# Altium PCB PROC106B_ASCII.PcbDoc (part 3 of 8)
Units mil, origin at the board's own origin, x right, y up, seen from the top; angles counter-clockwise.
Board outline 4498.18 x 1060.53 mil, 8 copper layers (Top Layer, GND1, Sig1, PWR1, PWR2, Sig2, GND2, Bottom Layer), stack 69.602 mil thick; 439 components, 327 nets, 1548 pads, 843 vias.
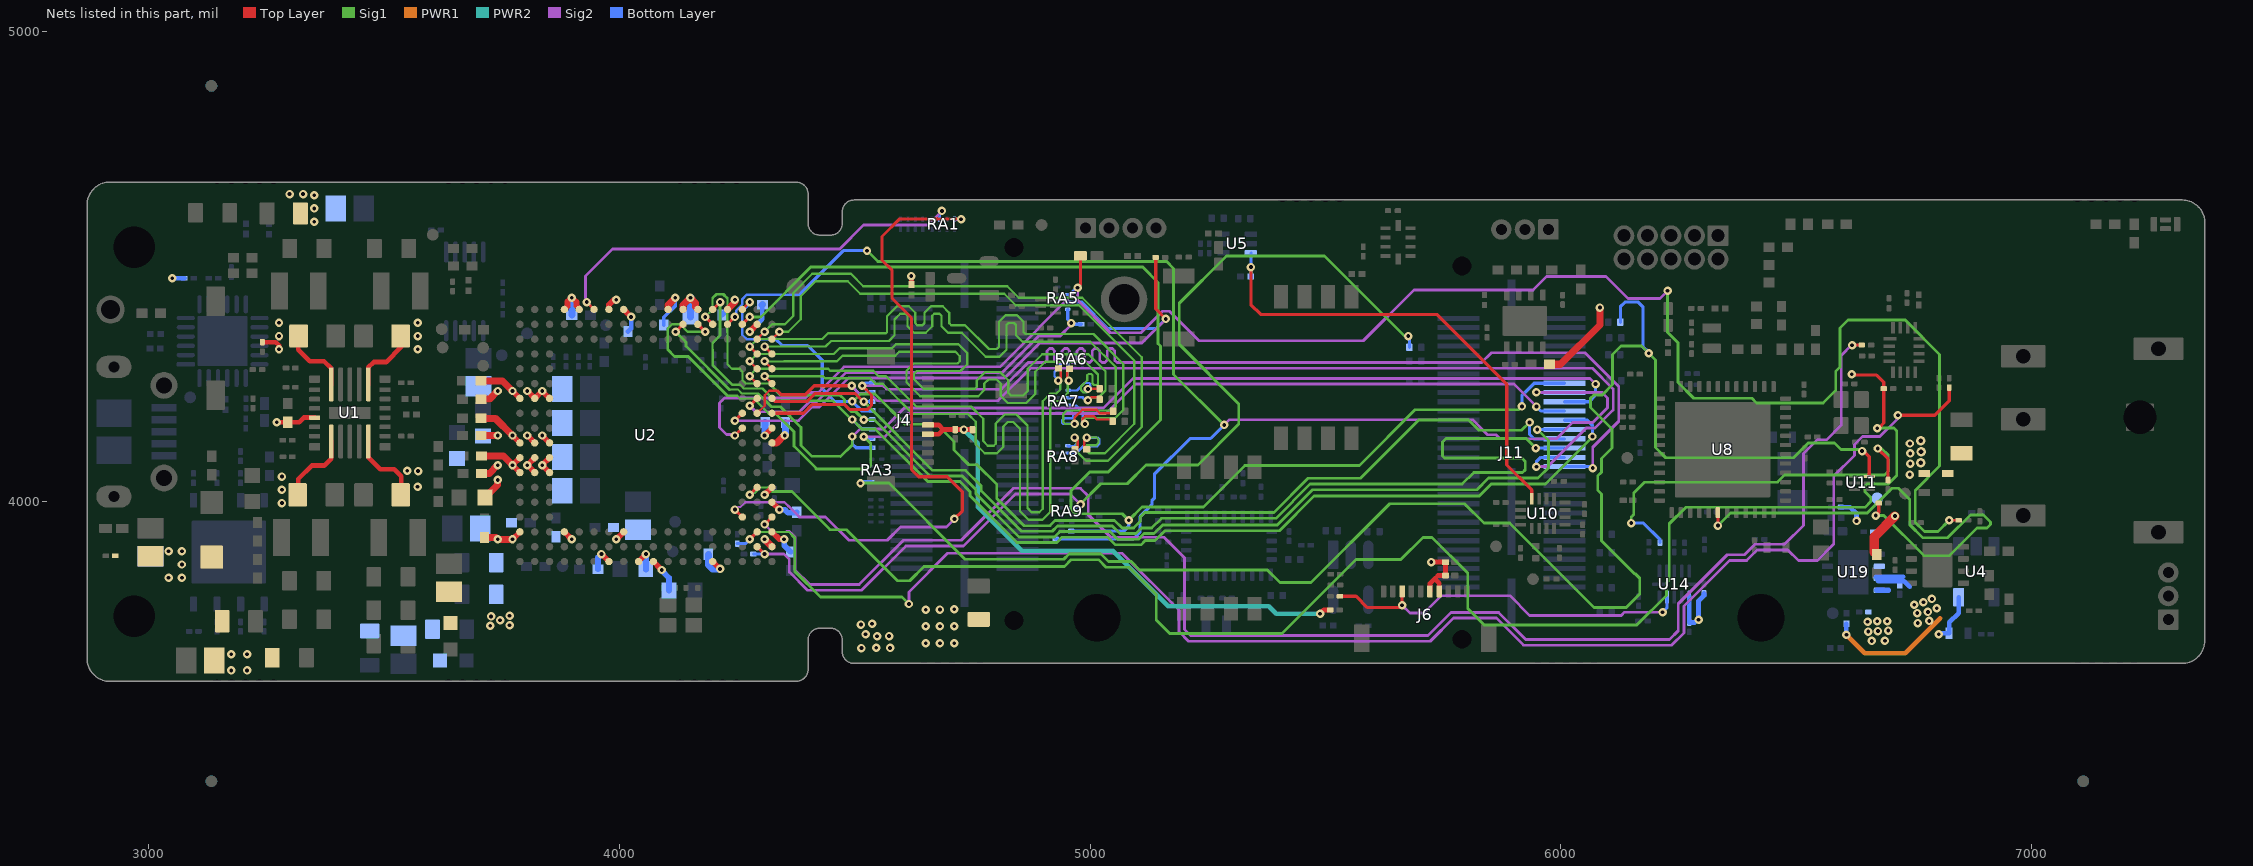
[diagram p9: the nets of this part, all layers, seen from the top]

## Part data
A1: library part CMP-0087189-1, "RF ANT 2.4GHZ CHIP SOLDER SMD"
C1 C4 C50 C51 C52 C53 C55 C59 C62 C65 C70 C76 C78 C82 C112 C113 C121: library part CMP-0008017-2, "CAP, CERM, 10 uF, 10 V, +/- 10%, X7R, 0805"
C2 C3 C91 C92 C101 C126 C130: library part CMP-0006351-2, "CAP, CERM, 0.1 uF, 16 V, +/- 10%, X7R, 0402"
C5 C11 C15 C16 C24 C115 C116 C129: library part CMP-0086446-1, "1µF ±20% 16V Ceramic Capacitor X5R 0201"
C6 C9 C10 C12 C13 C25 C26 C27 C35 C36 C37 C40 C43 C72 C86 C105 C107 C108 C109 C114 C117 C118 C119 C120 C123 C127 C128: library part CMP-0086440-1, "Cap Ceramic 0.1uF 35V X5R 10% Pad SMD 0201 85C T/R"
C7 C42 C122: library part CMP-0006339-4, "CAP, CERM, 10 uF, 10 V, +/- 20%, X5R, 0402"
C8 C125: library part CMP-0086445-1, "CAP CER 10000PF 25V X5R 0201"
C14 C71: library part CMP-0090493-1, "Cap Ceramic 4.7pF 50V C0G 0.25pF Pad SMD 0201 125°C Automotive T/R"
C17 C18: library part CMP-0086441-1, "Cap Ceramic 8pF 50V C0G 0.1pF SMD 0201 125°C Paper T/R"
C19 C20 C38 C39: library part CMP-0087190-1, "CAP CER 12PF 25V C0G/NP0 0201"
C21 C93: library part CMP-0006345-2, "CAP, CERM, 12 pF, 50 V, +/- 5%, C0G/NP0, 0402"
C22 C23 C41: library part CMP-0085178-1, "CAP, CERM, 1 pF, 50 V,+/- 25%, C0G/NP0, AEC-Q200 Grade 1, 0402"
C28 C29: library part CMP-0089043-4, "CAP CER 22UF 6.3V X5R 0402"
C30 C56 C57 C58 C60 C61 C63 C64 C66 C67 C68 C80 C81 C84 C85 C87 C88 C94 C95 C96 C97 C98: library part CMP-0078265-1, "CAP, CERM, 0.22 µF, 16 V,+/- 10%, X7R, AEC-Q200 Grade 1, 0402"
C31 C32 C33 C34: library part CMP-0085511-1, "CAP, CERM, 390 pF, 50 V,+/- 5%, C0G/NP0, AEC-Q200 Grade 1, 0402"
C44 C45 C46 C47 C48 C49 C54 C73 C75 C77 C111 C124 C131: library part CMP-0091983-1, "22µF ±20% 6.3V Ceramic Capacitor X7T 0805 (2012 Metric)"
C69: library part CMP-0006330-2, "CAP, CERM, 0.047 uF, 50 V, +/- 10%, X7R, AEC-Q200 Grade 1, 0402"
C74 C79 C83 C102 C103: library part CMP-0007134-5, "CAP, CERM, 2.2 uF, 6.3 V, +/- 10%, X7R, AEC-Q200 Grade 1, 0603"
C89 C90 C100: library part CMP-0007136-5, "CAP, CERM, 1 uF, 16 V, +/- 10%, X7R, AEC-Q200 Grade 1, 0603"
C99 C104: library part CMP-0086306-1, "CAP, CERM, 1.8 pF, 50 V,+/- 6%, C0G/NP0, 0402"
C106 C110: library part CMP-0006692-2, "CAP, CERM, 4700 pF, 50 V, +/- 10%, X7R, 0402"
D1: library part CMP-0090508-1, "Diode Schottky 30V 2A Surface Mount SOD-123FL"
FID1 FID2 FID3 FID4 FID5 FID6: library part CMP-0077181-1, "Fiducial mark.  There is nothing to buy or mount."
FL2 FL3 FL12 FL22: library part CMP-0078934-1, "Inductor, Ferrite Bead, Ferrite, 2.2 A, 0.035 ohm, AEC-Q200 Grade 1, SMD"
J1: library part CMP-0055293-1, "Connector, Receptacle, Micro-USB Type B, R/A, Bottom Mount SMT"
J2 J11: library part CMP-0075524-1, "Receptacle, 0.5 mm, 30x2, Gold, TH"
J3: library part CMP-0087187-1, "CONN HDR 1.27MM R/A AU 4POS"
J4 J6: library part CMP-0086453-1, "Easy-On™ Type FFC/FPC Connector, Right-Angle, Surface Mount, ZIF, Bottom Contact Style, 1.10mm Mated Height, 10 Circuits"
J5: library part CMP-0081851-1, "DC Power Jack, R/A, TH"
J7: library part CMP-0087786-1, "CONN HEADER R/A 10POS 1.27MM"
J8 J10: library part CMP-0087785-1, "CONN HEADER R/A 3POS 1.27MM"
L1 L6: library part CMP-0058626-1, "Inductor, Multilayer, Air Core, 2.4 nH, 0.3 A, 0.15 ohm, SMD"
L2 L3 L4 L5: library part CMP-0058944-1, "Inductor, Shielded, 470 nH, 4.7 A, 0.021 ohm, SMD"
L7: library part CMP-0062727-1, "Inductor, Multilayer, Ferrite, 6.8 uH, 0.11 A, 0.25 ohm, SMD"
L8: library part CMP-0003349-2, "Ferrite Bead, 1500 ohm @ 100 MHz, 0.5 A, 0603"
L9 L10: library part CMP-0058624-1, "Inductor, Multilayer, Air Core, 2 nH, 0.3 A, 0.1 ohm, SMD"
L11 L13 L15 L16: library part CMP-0089947-1, "100 Ohms @ 100MHz 1 Power Line Ferrite Bead 0805 (2012 Metric) 4A 20mOhm"
L12 L14: library part CMP-0077879-1, "Ferrite Bead, 120 ohm @ 100 MHz, 1.9 A, 0603"
LD1 LD2 LD3 LD4 LD5 LD6: library part CMP-0067682-2, "LED, Green, SMD"
Q1: library part CMP-0087176-1, "MOSFET N-CH 100V 170MA SOT23-3"
R1 R18 R20 R77 R78 R80 R81 R82 R93 R94 R95 R96 R98 R104 R110 R118 R122 R124 R125 R134 R177 R178: library part CMP-0088002-1, "10 kOhms ±0.5% 0.05W, 1/20W Chip Resistor 0201 (0603 Metric)  Thin Film"
R2 R28 R31 R32 R41 R60 R61 R62 R63 R103: library part CMP-0065361-1, "RES, 0, 5%, .05 W, AEC-Q200 Grade 0, 0201"
R3 R7 R8 R19 R21 R22 R23 R35 R36 R43 R44 R45 R59 R65 R83 R84 R85: library part CMP-0090084-1, "RES SMD 10K OHM 0.1% 1/20W 0201"
R4 R5 R9 R37: library part CMP-0090298-1, "100 kOhms ±1% 0.05W, 1/20W Chip Resistor 0201 (0603 Metric) Automotive AEC-Q200 Thick Film"
R6 R46 R47 R48 R49: library part CMP-0089575-2, "Res Thick Film 0201 33.2 Ohm 1% 0.05W(1/20W) ±200ppm/C Pad SMD Automotive T/R"
R10 R11 R88 R130 R132 R133 R135 R137 R138 R140: library part CMP-0087185-1, "RES SMD 20 OHM 1% 1/20W 0201"
R12 R14 R30 R51 R57 R58 R66 R67 R68 R70 R71 R72 R73 R74 R76 R86 R87 R90 R91 R97 R99 R100 R101 R102 R105 R106 R112 R113 R115 R116 R120 R121 R123 R127 R128 R129 R131 R136 R139 R142 R143 R144 R145 R146 R147 R148 R149 R150 R151 R152 R153 R154 R155 R157 R160 R161 R166 R168 R182 R183 R184 R185 R186 R187 R188 R189 R190: library part CMP-0086442-2, "RES SMD 0 OHM JUMPER 1/20W 0201"
R13 R17 R42 R111: library part CMP-0027072-1, "RES, 220, 5%, 0.05 W, 0201"
R15: library part CMP-0090501-1, "220 Ohms ±5% 0.05W, 1/20W Chip Resistor 0201 (0603 Metric) Automotive AEC-Q200 Thick Film"
R16: library part CMP-0027880-1, "RES, 7.87 k, 1%, 0.05 W, 0201"
R24: library part CMP-0087183-1, "RES SMD 200 OHM 1% 1/5W 0402"
R25 R26 R33 R34 R40 R64: library part CMP-0090497-1, "4.99 kOhms ±1% 0.05W, 1/20W Chip Resistor 0201 (0603 Metric) Automotive AEC-Q200 Thick Film"
R27 R107 R108: library part CMP-0027137-1, "RES, 510, 5%, 0.05 W, 0201"
R29 R89 R92: library part CMP-0027261-3, "RES, 100 k, 1%, 0.05 W, 0201"
R38 R69 R141: library part CMP-0027745-1, "RES, 4.99 k, 1%, 0.05 W, 0201"
R39: library part CMP-0090502-1, "510 Ohms ±5% 0.05W, 1/20W Chip Resistor 0201 (0603 Metric) Automotive AEC-Q200 Thick Film"
R50 R75: library part CMP-0090500-1, "1 kOhms ±5% 0.05W, 1/20W Chip Resistor 0201 (0603 Metric) Automotive AEC-Q200 Thick Film"
R52: library part CMP-0090496-1, "Res Thick Film 0201 1.96K Ohm 1% 1/20W 200ppm/C Molded SMD T/R"
R53 R54 R55 R56: library part CMP-0026363-2, "RES, 3.83, 1%, 0.063 W, AEC-Q200 Grade 0, 0402"
R79 R180 R181: library part CMP-0087184-1, "RESISTOR, 0201, 0.05W, 1%, 4K7"
R114 R117 R119 R126: library part CMP-0026491-2, "RES, 61.9, 1%, 0.063 W, AEC-Q200 Grade 0, 0402"
R158 R170 R172: library part CMP-0090499-1, "Res Thick Film 0201 82.5K Ohm 1% 1/20W ±200ppm/°C Molded SMD SMD T/R"
R159 R171: library part CMP-0090503-1, "Res Thick Film 0201 750 Ohm 5% 0.05W(1/20W) ±200ppm/C Pad SMD Automotive T/R"
R174 R176: library part CMP-0090498-1, "Res Thick Film 0201 7.87K Ohm 1% 1/20W ±200ppm/°C Molded SMD SMD T/R"
RA1 RA2 RA3 RA4 RA5 RA6 RA7 RA8 RA9: library part CMP-0087186-1, "RES ARRAY 4 RES ZERO OHM 0502"
S1 S2: library part CMP-0002128-2, "Switch, Slide, SPST 4 poles, SMT"
S3: library part CMP-0087181-1, "SWITCH SLIDE DIP SPST 100MA 6V"
SW2 SW3: library part CMP-0002150-2, "SWITCH TACTILE SPST-NO 0.05A 12V"
TP2 TP3 TP4 TP5 TP6 TP7 TP8 TP9 TP10 TP12 TP13 TP14 TP15 TP16 TP17 TP18 TP19 TP26 TP27 TP46: library part CMP-0078143-3, "TEST POINT.  No entry in BOM."
TP11: library part CMP-0003825-1, "1mm Test Point, SMT"
TP20: library part CMP-0086474-1, "PC Test Point, Loop Brass, Tin Plating 0.047\" (1.19mm) Hole Diameter Mounting Type"
U1: library part CMP-0079120-2, "4-A + 2.5-A + Two 1.5-A Buck Converters With Integrated Switches, RNF0026C (VQFN-HR-26)"
U2: library part CMP-0090288-2
U3: library part CMP-0087172-1, "I/O Controller Interface IC USB to Dual UART bridge"
U4: library part CMP-0035419-1, "Single Output High PSRR LDO, 200 mA, Fixed 3 V Output, 2.7 to 5.5 V Input, 5-pin SOT-23 (DBV), -40 to 85 degC, Green (RoHS & no Sb/Br)"
U5: library part CMP-0067398-2, "Automotive Grade, 1.4V-Capable +/-0.5degC Temperature Sensor with Alert Function and I2C/SMBus, DRL0006A (SOT-OTHER-6)"
U6: library part CMP-0087170-1, "8KB I2C SER EEPROM TSOT 23"
U7: library part CMP-0087171-1, "IMU ACCEL/GYRO/MAG I2C 32BIT"
U8: library part CMP-0083675-2, "SimpleLink(TM) Bluetooth(R) 5 low energy Wireless MCU, RGZ0048A (VQFN-48)"
U9: library part CMP-0079267-1, "2.3V-3.6V, 16M-BIT [x 1/x 2/x 4] CMOS FLASH Memory, WSON-8"
U10: library part CMP-0043349-1, "Low-Voltage 8-Bit I2C and SMBus I/O Expander, 1.65 to 5.5 V, -40 to 85 degC, 16-pin UQFN (RSV), Green (RoHS & no Sb/Br)"
U11: library part CMP-0050992-5, "1-Channel, 2:1 Analog Switch, DSF0006A (X2SON-6)"
U12 U17: library part CMP-0065183-3, "Automotive Fault Protected CAN Transceiver With Flexible Data-Rate, DRB0008F (VSON-8)"
U13: library part CMP-0067415-1, "10-Ohm Quad SPDT Analog Switch, RSV0016A (UQFN-16)"
U14: library part CMP-0860038-1, "Automotive 4-Bit Bidirectional Voltage-Level Translator with Auto Direction Sensing and +/-15kV ESD, RUT0012A (UQFN-12)"
U15: library part CMP-0074545-1, "Dual 10-ohm SPDT Analog Switch, RSE0010A (UQFN-10)"
U16: library part CMP-0087998-2, "AND Gate IC 1 Channel  6-SON (1x1)"
U18: library part CMP-0074341-1, "Automotive Catalog Dual 15-Ohm SPDT Analog Switch, DGS0010A (VSSOP-10)"
U19: library part CMP-0043358-3, "Dual In / Single Out Autoswitching Power Mux, 2.8 to 5.5 V, -40 to 85 degC, 8-pin SON (DRB), Green (RoHS & no Sb/Br)"
Y1: library part CMP-0090505-1, "40MHz ±10ppm Crystal 8pF 50 Ohms 4-SMD, No Lead"
Y2: library part CMP-0088076-1, "48MHz ±20ppm Crystal 7pF 50 Ohms 4-SMD, No Lead"
Y3 Y4: library part CMP-0088006-1, "CRYSTAL 32.768KHZ 4PF SMD"
ZZ1: library part CMP-0003616-3
ZZ2: library part CMP-0077236-1
ZZ3: library part CMP-0077237-1
ZZ4 ZZ5.2: library part CMP-0077238-1
ZZ5.1: library part CMP-0077238-1, "Cut the thermal pad(Part Number#GPVOUS-0.125-AC-0816) for the shape and size of the inner surface of the heatsink(Part Number#160018120021) and paste it on the inner surface of the heatsink;"

## Free pads (board coordinates)
  round 19 hole 24 unplated: ""(3145.41,4687.43) ""(3145.41,3610.9) ""(3175.41,4687.43) ""(3175.41,3610.9) ""(3205.41,4687.43) ""(3205.41,3610.9) ""(3235.41,4687.43) ""(3235.41,3610.9) ""(3265.41,4687.43) ""(3265.41,3610.9) ""(3637.19,4687.43) ""(3637.19,3610.9) ""(3667.19,4687.43) ""(3667.19,3610.9) ""(3697.19,4687.43) ""(3697.19,3610.9) ""(3727.19,4687.43) ""(3727.19,3610.9) ""(3757.19,4687.43) ""(3757.19,3610.9) ""(4128.97,3610.9) ""(4128.97,4687.43) ""(4158.97,3610.9) ""(4158.97,4687.43) ""(4188.97,4687.43) ""(4188.97,3610.9) ""(4218.97,3610.9) ""(4218.97,4687.43) ""(4248.97,3610.9) ""(4248.97,4687.43) ""(4646.5,3648.05) ""(4676.5,3648.05) ""(4706.5,3648.05) ""(4736.5,3648.05) ""(4766.5,3648.05) ""(5409.11,4649.48) ""(5439.11,4649.48) ""(5469.11,4649.48) ""(5499.11,4649.48) ""(5529.11,4649.48) ""(5950.52,3648.05) ""(5980.52,3648.05) ""(6010.52,3648.05) ""(6040.52,3648.05) ""(6070.52,3648.05) ""(7097.6,3648.05) ""(7097.68,4649.43) ""(7127.6,3648.05) ""(7127.68,4649.43) ""(7157.6,3648.05) ""(7157.68,4649.43) ""(7187.6,3648.05) ""(7187.68,4649.43) ""(7217.6,3648.05) ""(7217.68,4649.43)

## Via types
v1: diameter 18, hole 8, Top Layer to Bottom Layer, tented both sides, 804 vias
v2: diameter 19.68, hole 7.87, Top Layer to Bottom Layer, tented both sides, 34 vias
v3: diameter 20, hole 10, Top Layer to Bottom Layer, tented both sides, 3 vias
v4: diameter 18, hole 8, Top Layer to Bottom Layer, 1 vias
v5: diameter 17, hole 7.87, Top Layer to Bottom Layer, 1 vias

## Nets (pads, with @x,y where several pads share a name; then routed paths per layer and width w, separated by ;. In a path a pad name is that pad's centre, name@x,y a point inside that pad or via, vN(x,y) a via of type N, cw(c..) or ccw(c..) an arc to the next point about the centre after c; other vN are vias at no path point)
3V0: C7.1 C15.1 C16.1 C115.1 C116.1 C118.1 J4.6 J4.7 J6.6 J6.7 R79.2 R181.2 U4.5 U14.1 | length 1553.4
  Top Layer w10: J4.7@4655.33,4143.81 4678.32,4143.81 4688.3,4153.79 ; J4.6@4655.33,4163.49 4678.59,4163.49 4688.3,4153.79 ; C15.1@4750.21,4153.69 4750.12,4153.79 v1(4731.8,4153.79) C16.1@4713.47,4153.79 4688.3,4153.79 ; v1(5488.42,3762.4) 5496.67,3770.65 R181.2@5510.03,3770.65 ; J6.6@5721.75,3810.06 5721.75,3826.54 5731.98,3836.77 ; v1@5724.8,3872.26 5724.87,3872.2 C115.1@5754.85,3872.2 C116.1@5754.85,3843.74 5738.95,3843.74 5731.98,3836.77 ; J6.7@5741.43,3807.06 5741.43,3827.32 5731.98,3836.77
  PWR2 w10: v1(4731.8,4153.79) 4761,4124.58 4761,3989.4 4854.25,3896.15 5048.17,3896.15 5165.74,3778.57 5379.01,3778.57 5395.18,3762.4 v1(5488.42,3762.4)
  Bottom Layer w10: U14.1@6272.54,3799.77 6272.54,3764.35 6272.5,3764.32 C118.1@6272.5,3743.88 6284.34,3743.88 6292.44,3751.98 6292.44,3789.79 6304.11,3801.46 R79.2@6304.11,3805.64 ; v1(6802.79,3718.79) 6804.79,3720.79 C7.1@6824.78,3720.79 6824.78,3743.97 6844.78,3763.97 U4.5@6844.78,3797.49
  other v1: 6292.44,3749.79 5724.6,3872.26
5V_HD_IN: C128.1 L16.2 R20.1 U19.8 | length 78.8
  Bottom Layer w10: R20.1@6594.7,3988.94 6614.05,3988.94 6628.05,3974.95 v1(6628.05,3959.58)
  Bottom Layer w12: U19.8@6671.07,3812.08 6695.37,3812.08
  other v1: 4650.94,3699.61 4681.04,3699.61 4711.61,3699.61 6660.22,3704.68 6688.14,3705.36 6652.66,3724.54 6673.29,3725.69 6695.37,3726.86 4650.94,3735.76 4681.04,3735.76 4711.61,3735.76 6651.3,3745.4 6671.76,3746.63 6693.22,3746.68 4650.93,3770.89 4681.04,3771.4 4711.61,3772.13
5V_IN: C1.2 C4.1 C30.1 C50.1 C51.1 C52.1 C53.1 C129.1 D1.1 FL3.2 FL12.2 R27.1 R39.1 R50.2 R64.1 R107.1 U1.9 U1.13 U1.18 U1.22 U1.26 U19.7 | length 1553.7
  Top Layer w10: R50.2@3241.63,4339.44 3270.32,4339.44 3277.02,4332.74 v1@3277.02,4326.81 ; v1(3272.33,4169.32) C30.1@3295.87,4169.32 3319.81,4169.32 3329.65,4179.16 U1.18@3352.68,4179.16 ; C50.1@3318.11,4009.52 3318.11,4048.7 3346.62,4077.21 3373.07,4077.21 3388.04,4092.18 ; C52.1@3318.11,4368.48 3318.11,4323.58 3342.64,4299.04 3372.63,4299.04 3388.11,4283.56 U1.13@3388.11,4249.63 ; 3388.11,4092.18 U1.22@3388.11,4128.37 ; U1.26@3466.85,4128.37 3466.85,4094.45 3492.01,4069.29 3521.99,4069.29 3536.85,4054.43 C51.1@3536.85,4009.52 ; U1.9@3466.85,4249.63 3466.85,4285.9 3478.07,4297.12 3504.66,4297.12 3536.85,4329.31 C53.1@3536.85,4368.48 ; v1(4620.27,4479.75) 4620.57,4479.46 R107.1@4620.57,4461.7
  Top Layer w15: FL12.2@5975.6,4292.41 5999,4292.41 6082.75,4376.16 v1(6082.75,4412.79)
  Top Layer w20: FL3.2@6670.79,3888.25 6665.81,3893.23 6665.81,3926.17 v5(6709.55,3969.91)
  PWR1 w10: v1(6606.39,3717.68) 6645.55,3678.52 6731.31,3678.52 6805.46,3752.67
  Bottom Layer w10: v1(3050.47,4475.15) R64.1@3076.13,4475.15 ; v1(6606.39,3717.68) R27.1@6606.39,3741.52 ; U19.7@6673.76,3836.69 6698.11,3836.69 6703.21,3831.6 ; 6711.81,3839.4 6710.11,3841.1 ; 6726.91,3841.1 6710.11,3841.1 ; 6740.73,3819.94 6729.08,3831.6 6703.21,3831.6 ; 6703.21,3831.6 6673.82,3831.6 6669.11,3840.2 6670.01,3841.1 6710.11,3841.1
  other v1: 4514.3,3689.55 4545.9,3690.22 4574.96,3689.89 4547.43,3714.8 4572.89,3715.13 4522.96,3718.74 4513.24,3739.55 4536.9,3741.13 6757.93,3742.77 6782.31,3747.33 6756.77,3763.83 6779.56,3766.42 6798.43,3774.05 6750.69,3781.76 6770.14,3787.01 6788.19,3794.02 3042.55,3838.89 3070.75,3838.89 3070.75,3867.09 3042.55,3895.28 3070.75,3895.28 3283.23,3997.47 3283.23,4025.66 3571.45,4032.48 3283.23,4053.86 3549.23,4066.35 3572.38,4065.53 3277.02,4324.15 3571.73,4324.15 3277.02,4352.35 3571.73,4352.35 3277.02,4380.54 3571.73,4380.54
5V_IN_B: C42.2 C122.1 C127.1 L15.2 TP4.1 U19.6
  other v1: 6741.2,4058 6741.81,4081.54 6741.81,4103 6741.32,4124.11
  other v3: 6764.6,4082.97 6765.01,4106.67 6764.46,4130
ALERT: R38.1 U5.3 U10.4 | length 1009.2
  Top Layer w6.7: v1(5341.5,4498.97) 5341.5,4418.98 5362.14,4398.33 5736.3,4398.33 5885.05,4249.58 5885.05,4078.41 5937.93,4025.53 U10.4@5937.93,4006.69
  Bottom Layer w6.7: R38.1@5341.5,4478.82 v1(5341.5,4498.97) U5.3@5341.5,4529.03 U5.3@5341.84,4528.69
AR_1P0_RF1: C75.2 C78.1 C79.1 C80.1 C81.1 C113.1 C124.2 L12.2 U2.J16 U2.J17 U2.J18 | length 184.7
  Top Layer w12: v1(3773.02,4141.13) U2.J18@3788.76,4125.38 ; v1(3804.51,4141.13) U2.J17@3820.26,4125.38 ; v1(3836.01,4141.13) U2.J16@3851.76,4125.38
  Top Layer w15: C80.1@3705.88,4141.13 v1(3741.52,4141.13) ; C81.1@3705.88,4177.66 3736.48,4177.66 v1(3773.02,4141.13)
  other v1: 3725.88,3737.02 3766.78,3737.9 3746.66,3748.61 3727.42,3756.7 3766.78,3758.45
AR_1P0_RF2: C70.1 C74.1 C82.1 C83.1 C84.1 C85.1 C111.2 C121.1 C131.2 L14.2 U2.G16 U2.G17 U2.G18 U2.H16 U2.H17 U2.H18 | length 297.2
  Top Layer w12: U2.G18@3788.76,4062.39 v1(3773.02,4078.14) U2.H18@3788.76,4093.88 ; U2.G17@3820.26,4062.39 v1(3804.51,4078.14) U2.H17@3820.26,4093.88 ; U2.G16@3851.76,4062.39 v1(3836.01,4078.14) U2.H16@3851.76,4093.88
  Top Layer w15: C84.1@3707.42,4060.46 3723.84,4060.46 v1(3741.52,4078.14) ; C85.1@3707.42,4097.51 3753.64,4097.51 v1(3773.02,4078.14) ; C74.1@3714.74,4009.15 3741.52,4035.93 v1(3741.52,4046.64)
AR_1P2: C76.1 C91.2 C92.2 C94.1 C95.1 C96.1 C97.1 C98.1 C103.1 L13.2 U2.A5 U2.C1 U2.E1 U2.J1 U2.V4 U2.V6 U2.V7 U2.V8 U2.V12 U2.V14 U2.V15 | length 667.8
  Top Layer w12: U2.V15@3883.25,4408.84 3890,4415.59 3890,4425.59 3899,4434.59 3909,4424.59 3909,4417 3914.75,4411.25 U2.V14@3914.75,4408.84 ; U2.V12@3977.74,4408.84 3977.74,4418.84 3988.49,4429.59 v1(3993.49,4429.59) ; U2.A5@4198.21,3873.41 v1(4213.96,3857.66) ; U2.C1@4324.2,3936.4 4339.94,3920.65 v1(4349.94,3920.65) ; U2.E1@4324.2,3999.4 4324.33,3999.4 v1(4340.08,3983.65)
  Top Layer w15: U2.V8@4103.72,4408.84 4103.72,4418.45 v1(4118.96,4433.68) ; U2.V7@4135.22,4408.84 4135.22,4417.93 v1(4150.97,4433.68) 4161.76,4422.88 4161.76,4413.8 U2.V6@4166.72,4408.84 ; U2.V4@4229.71,4408.84 4245.46,4424.59 v1(4245.46,4429.68) ; U2.J1@4324.2,4125.38 4334.2,4125.38 v1@4350.05,4141.24
  Bottom Layer w8: C96.1@4094.31,4375.82 4094.31,4392.25 4118.96,4416.91 v1(4118.96,4433.68)
  Bottom Layer w10: v1@3898.96,4434.55 v1@3899,4434.59 ; v1(4150.97,4433.68) v1@4150.97,4434.59
  Bottom Layer w12: C91.2@4218.02,4397.33 4245.46,4424.77 v1(4245.46,4429.68) ; v1(4340.08,3983.65) 4351.45,3983.65 4358.24,3976.86 4375.3,3976.86 C95.1@4376.53,3978.09 ; v1@4350,3920 4350,3908 C94.1@4364,3894
  Bottom Layer w15: C98.1@3898.96,4396.76 v1@3898.96,4434.55 ; C103.1@4150.97,4392.63 v1(4150.97,4433.68) ; C97.1@4188.97,3888.79 4189.39,3888.36 4189.39,3866.45 4198.18,3857.66 v1(4213.96,3857.66) ; v1@4350.05,4141.24 4352.69,4143.87 C92.2@4352.69,4168.77
  other v1: 4351.25,4141.24 3899,4433.68 3352.15,4595.26 3352.15,4623.45 3352.15,4651.65 3299.59,4653.99 3328.09,4653.99
AR_1V4_APLL: C90.1 U2.A10 | length 56.1
  Top Layer w12: U2.A10@4040.73,3873.41 v1(4056.48,3889.16)
  Bottom Layer w10: C90.1@4056.23,3855.43 C90.1@4056.48,3855.68
  Bottom Layer w12: C90.1@4056.48,3855.68 v1(4056.48,3889.16)
AR_1V4_SYNTH: C89.1 U2.A9 | length 72
  Top Layer w12: U2.A9@4072.23,3873.41 v1@4087.98,3857.66
  Bottom Layer w12: v1(4090.2,3855.43) 4090.2,3853.81 4105.41,3838.6 C89.1@4105.41,3811.96
AR_1V8: C55.1 C56.1 C57.1 C58.1 C59.1 C60.1 C61.1 C62.1 C63.1 C64.1 C65.1 C66.1 C67.1 C68.1 C73.2 C112.1 L11.2 U2.A12 U2.B1 U2.C11 U2.C15 U2.C18 U2.F1 U2.K1 U2.M16 U2.M17 U2.M18 U2.U2 U2.V11 | length 635.6
  Top Layer w12: v1(3773.02,3920.65) U2.C18@3788.76,3936.4 ; v1(3773.02,4235.62) U2.M18@3788.76,4219.87 ; v1(3804.51,4235.62) U2.M17@3820.26,4219.87 v1(3836.01,4235.62) U2.M16@3851.76,4219.87 ; U2.C15@3883.25,3936.4 v1(3899,3920.65) ; v1(3961.99,3889.16) U2.A12@3977.74,3873.41 ; v1(3993.49,3920.66) U2.C11@4009.24,3936.4 ; U2.V11@4009.24,4408.84 v1(4024.98,4393.1) ; v1(4276.95,4361.6) U2.U2@4292.7,4377.35 ; v1(4308.45,4015.14) U2.F1@4324.2,4030.89 ; v1(4308.45,4141.13) U2.K1@4324.2,4156.88
  Top Layer w15: C58.1@3705.86,4218.19 3724.1,4218.19 v1(3741.52,4235.62) ; C57.1@3705.86,4257.19 3751.44,4257.19 v1(3773.02,4235.62) ; C68.1@3713.57,3924.11 3738.07,3924.11 v1(3741.52,3920.65) v1(3773.02,3920.65) ; v1(4308.45,3920.65) U2.B1@4324.2,3904.91
  Bottom Layer w10: C61.1@4018.33,4361.9 4024.98,4368.55 v1(4024.98,4393.1) ; v1(4276.95,4361.6) 4303.38,4388.02 C56.1@4303.38,4418.18 ; v1(4308.45,4141.13) v1@4309.75,4142.43
  Bottom Layer w12: C63.1@3954.76,3856.83 3954.76,3881.92 v1(3961.99,3889.16)
  Bottom Layer w15: C56.1@4303.38,4418.18 C56.1@4304.26,4419.07 ; v1@4309.75,4142.43 C60.1@4309.75,4168.77
  other v1: 3175.57,3642.06 3209.12,3642.06 3175.57,3676.64 3209.12,3676.64
AR_BSS_LOGGER: RA1.4 U2.D3 | length 1457.8
  Top Layer w6.7: v1(4245.46,3983.65) U2.D3@4261.2,3967.9 ; v1(4711.71,3963.9) 4728.31,3980.49 4728.31,4021.77 4696.67,4053.41 4635.8,4053.41 4620.6,4068.61 4620.6,4390.98 4579.49,4432.09 4579.49,4491.76 4557.8,4513.46 4557.8,4563.91 4594.61,4600.72 4725.6,4600.72 v1(4725.75,4600.58)
  Sig2 w4.5: v1(4245.46,3983.65) 4250.76,3988.95 4256.7,3988.95 4267.15,3999.4 4350.75,3999.4 4358.91,3991.23
  Sig2 w5.95: 4358.91,3991.23 4382.26,3967.89 4438.09,3967.89 4487.48,3918.5 4569.04,3918.5 4597.24,3946.7 4694.51,3946.7 v1(4711.71,3963.9)
  Bottom Layer w6.7: RA1.4@4711.71,4600.58 v1(4725.75,4600.58)
AR_CS1: R9.2 R139.2 U2.C2 | length 3317
  Top Layer w6.7: v1(4276.95,3920.66) U2.C2@4292.7,3936.4 ; v1(6715.81,4184) 6794.11,4184 6824.81,4214.7 R139.2@6824.81,4242.98
  Sig1 w4.5: v1(4276.95,3920.66) 4292.55,3936.25 ; 4292.57,3936.4 4359.48,3936.4 4367.2,3928.68
  Sig1 w5.95: 4367.2,3928.68 4372.68,3923.2 4372.68,3852.89 4427.56,3798 4600.39,3798 v1(4615.19,3783.2)
  Sig2 w5.95: v1(4615.19,3783.2) 4615.19,3808.93 4697.19,3890.93 5068.04,3890.93 5188.57,3770.4 5188.57,3724.39 5208.81,3704.15 5722.57,3704.15 5771.73,3753.31 5862.89,3753.31 5920.43,3695.78 6235.45,3695.78 6261.24,3721.57 6261.24,3778.92 6358.17,3875.85 6394.55,3875.85 6416.88,3898.18 6481.96,3898.18 6504.38,3875.76 6544.85,3875.76 6579.54,3910.44 6579.54,4054.9 6623.31,4098.68 6623.31,4121.75 6640.56,4138.99 6677.31,4138.99 6715.81,4177.5 v1(6715.81,4184)
  Bottom Layer w6.7: R9.2@4250.53,3911.55 4267.85,3911.55 v1(4276.95,3920.66)
AR_CS1_60PIN: R150.2 RA3.1 U11.3 | length 3577.1
  Top Layer w6.7: v1@6639.79,4111.11 6655.07,4095.82 U11.3@6655.07,4054.07
  Sig1 w5.95: v1(4512.23,4039.9) 4572.79,4039.9 4734.57,3878.13 4943.97,3878.13 4955.07,3889.24 5022.69,3889.24 5038.76,3873.16 5087.38,3873.16 5105.13,3855.41 5376.27,3855.41 5403.06,3828.62 5468.8,3828.62 5636.32,3996.14 5795.11,3996.14 5836.32,3954.93 5891.16,3954.93 6070.18,3775.91 6138.83,3775.91 6167.52,3804.59 6167.52,3837.84 6157.87,3847.49 6156.34,3847.49 6086.26,3917.56 6086.26,4017.07 6078.05,4025.28 6078.05,4054.78 6086.26,4062.99 6086.26,4092.5 6108.35,4114.59 6108.35,4155.16 6062.88,4200.64 6062.88,4220.16 6069.96,4227.25 6087.72,4227.25 6109.66,4249.18 6109.66,4313.09 6127.8,4331.24 6171.18,4331.24 v1(6186.75,4315.67) 6200.65,4301.78 6200.65,4115.91 6222.76,4093.79 6494.18,4093.79 6525.34,4124.95 6581.02,4124.95 6594.86,4111.11 v1@6639.79,4111.11
  Bottom Layer w6.7: v1(4512.23,4039.9) 4513.87,4039.9 4517.57,4043.61 RA3.1@4535.95,4043.61 ; R150.2@6126.41,4381.76 6126.41,4414.59 6136.18,4424.36 6164.48,4424.36 6174.21,4414.64 6174.21,4330.28 6186.75,4317.73 v1(6186.75,4315.67)
  other v1: 6639.79,4107.91
AR_CS1_BT: R105.2 U8.30 | length 1081.1
  Top Layer w6.7: v1(6333.54,3949.8) U8.30@6333.54,3977.25 ; v1(6668.81,3971.01) 6675.01,3977.22 R105.2@6675.01,3997.34
  Sig1 w5.95: v1(6333.54,3949.8) 6360.37,3976.64 6650.73,3976.64 6703.16,4029.07 6717.11,4029.07 6740.89,4005.29 6740.89,3951.61 6768.42,3924.08 6821.79,3924.08 6869.97,3972.26 6897.81,3972.26 6912.48,3957.59 6912.48,3951.77 6905.1,3944.39 6884.07,3944.39 6825.56,3885.88 6770.99,3885.88 6685.86,3971.01 v1(6668.81,3971.01)
AR_CS1_LCD: R76.2 R106.2 | length 847.6
  Top Layer w6.7: v1(6673.04,4113.48) 6673.04,4113.33 6695.04,4091.34 R106.2@6695.04,4046.53
  Sig1 w5.95: v4(6149.58,3955.16) 6149.58,3967.73 6154.54,3972.7 6154.54,4018.54 6178,4042 6459.94,4042 6475.03,4057.09 6687.59,4057.09 6695.45,4064.95 6695.45,4099.24 6681.21,4113.48 v1(6673.04,4113.48)
  Bottom Layer w6.7: v4@6150.63,3956.21 v4(6149.58,3955.16) 6174.89,3955.16 6210.78,3919.27 R76.2@6210.78,3913.46
AR_CS1_LCD_T: J6.3 R183.1 U14.4 | length 808.1
  Top Layer w6.7: R183.1@5530.62,3799.62 5564.89,3799.62 5589,3775.51 5662.69,3775.51 v1(5662.69,3780.5) J6.3@5662.69,3810.06
  Sig2 w5.95: v1(5662.69,3780.5) 5679.39,3763.8 5708.98,3763.8 5746.07,3800.89 5891.53,3800.89 5933.37,3759.05 6128.25,3759.05 6135,3765.81 v1(6215.84,3765.81)
  Bottom Layer w6.7: v1(6215.84,3765.81) 6225.29,3775.26 U14.4@6225.29,3797.8
AR_DMM_CLK: J11.15 R11.1 U2.U3 | length 2863.5
  Top Layer w6.7: U2.U3@4261.2,4377.35 v1(4276.95,4393.1)
  Sig1 w5.95: v1(4276.95,4393.1) 4300.77,4393.1 4406.49,4498.81 5111.66,4498.81 5144.37,4466.1 5144.37,4336.15 5149.25,4331.27 5149.25,4174.31 5038.48,4063.54 4999.25,4063.54 4959.53,4023.82 4959.53,3983.93 4968.69,3974.76 5068.35,3974.76 v1(5082.11,3961) 5110.48,3989.37 5240.5,3989.37 5328.59,4077.46 5572.06,4077.46 5690.34,4195.73 5910.11,4195.73 v1(5917.11,4202.74)
  Bottom Layer w6.7: R11.1@4960.02,3937.94 5071.27,3937.94 5082.11,3948.78 v1(5082.11,3961) ; v1(5917.11,4202.74) 5917.11,4225.75 5943.5,4252.14 J11.15@6007.91,4252.14
AR_DMM_SYNC: J11.17 R10.1 U2.U4 | length 3035.4
  Top Layer w6.7: U2.U4@4229.71,4377.35 v1(4245.46,4393.1)
  Sig1 w5.95: v1(4526.01,4533.75) 4549.05,4510.71 5162.64,4510.71 5177.31,4496.03 5177.31,4270.93 v1(5284.75,4163.49)
  Sig2 w5.95: v1(5284.75,4163.49) 5296,4174.75 5811.84,4174.75 5843.88,4142.71 5862.4,4142.71 5871.08,4134.03 5990.13,4134.03 6024.74,4168.63 6067.55,4168.63 6099.07,4200.15 6099.07,4221.06 6087.61,4232.53 5948.46,4232.53 v1(5947.91,4233.07)
  Bottom Layer w5: v1(4245.46,4393.1) 4247.94,4395.58 4247.94,4406.09 4261.2,4419.35 4261.2,4430.66 4261.25,4430.71 4261.25,4431.1 4270.45,4440.29 4287.98,4440.29 4382.34,4440.31 4385,4442.97
  Bottom Layer w5.5: J11.17@6007.91,4232.45 J11.17@6008.02,4232.56
  Bottom Layer w6.7: 4385,4442.97 4475.78,4533.75 v1(4526.01,4533.75) ; R10.1@4927.02,3921 5090.97,3921 5106.23,3936.25 5106.23,3969.32 5131.09,3994.18 5131.09,4002.21 5136.5,4007.62 5136.5,4058.65 5212.51,4134.66 5255.92,4134.66 v1(5284.75,4163.49) ; v1@5946.67,4229.5 v1@5947.91,4230.74 ; v1(5947.91,4233.07) v1@5947.91,4230.74 ; J11.17@6007.91,4232.45 5949.62,4232.45 v1@5947.91,4230.74
AR_DP0: J11.19 R88.1 U2.U7 | length 2348.9
  Top Layer w6.7: v1(4119.47,4361.6) U2.U7@4135.22,4377.35
  Sig1 w4.5: 4233.93,4238.41 4252.3,4238.41 4260.24,4230.47 4294.69,4230.47
  Sig1 w5.95: v1(4119.47,4361.6) 4141.45,4339.62 4141.45,4330.89 4233.93,4238.41 ; 4295.71,4229.45 4323.07,4202.09 4342.27,4202.09 4385.89,4158.47 4385.89,4120.26 4409.3,4096.84 4469.39,4096.84 4469.78,4096.45 4494.9,4121.58 v1(4494.9,4138.98)
  Sig2 w5.95: v1(4494.9,4138.98) 4511.03,4155.1 4560.94,4155.1 4605.25,4199.42 5028.67,4199.42 5091.43,4262.18 6061.63,4262.18 v1(6073.52,4250.28)
  Bottom Layer w6.7: v1@4494.9,4134.98 4494.9,4123.11 4503.04,4114.97 R88.1@4537.25,4114.97 ; J11.19@6007.91,4212.77 6060.26,4212.77 6073.52,4226.03 v1(6073.52,4250.28)
AR_DP1: J11.21 R130.1 U2.U6 | length 2360.1
  Top Layer w6.7: U2.U6@4166.72,4377.35 v1(4182.46,4361.6)
  Sig1 w4.5: 4103,4368.42 4111.93,4377.35 4128.99,4377.35 4144.74,4361.6 v1(4182.46,4361.6) ; 4229.91,4225.61 4250.33,4225.61 4255.92,4220.03 4284.86,4220.03 4316.74,4188.14
  Sig1 w5.95: 4103,4368.42 4103,4323.28 4117.2,4309.08 4146.44,4309.08 4229.91,4225.61 ; 4316.74,4188.14 4331.88,4188.14 4370.86,4149.16 4370.86,4118.46 4417.54,4071.79 4417.54,4069.92 4526.78,4069.92 4534.17,4077.3 4534.17,4123.47 v1(4519,4138.63)
  Sig2 w5.95: v1(4519,4138.63) 4564,4138.63 4612.89,4187.52 5033.59,4187.52 5096.35,4250.28 5900.26,4250.28 v1(5947.9,4202.64)
  Bottom Layer w6.7: v1@4519,4134.63 R130.1@4537.25,4134.63 ; v1(5947.9,4202.64) 5957.46,4193.08 J11.21@6007.91,4193.08
AR_DP2: J11.23 R132.1 U2.V5 | length 2435.9
  Top Layer w5.5: v1(4213.96,4424.59) v1@4214.41,4425.04
  Top Layer w6.7: U2.V5@4198.21,4408.84 v1(4213.96,4424.59)
  Sig1 w4.5: 4198.21,4322.56 4198.21,4336.63 4198.21,4337.65 ; 4240.31,4248.86 4256.63,4248.86 4264.57,4240.92 4304.42,4240.92
  Sig1 w5.95: 4198.21,4322.56 4198.21,4290.95 4239.58,4249.58 ; 4198.21,4337.65 4213.96,4353.4 v1(4213.96,4424.59) ; 4305.18,4240.16 4330.57,4214.77 4453.46,4214.77 4488.56,4179.67 4490.32,4179.67 v1(4494.9,4175.09) 4514.89,4155.1 4543.36,4155.1 4655.16,4043.31 4723.42,4043.31 4745.07,4021.66 4745.07,4013.15 4844.29,3913.93 4929.3,3913.93 4940.54,3925.16 5037.22,3925.16 5053.54,3908.85 5107.85,3908.85 5117.16,3918.16 5137.98,3918.16 5158.66,3938.83 5402.06,3938.83 5475.84,4012.61 5826.59,4012.61 5852.07,4038.09 5966.94,4038.09 6066.87,4138.03 v1(6066.87,4138.99)
  Bottom Layer w6.7: v1(4494.9,4175.09) 4514.56,4155.43 R132.1@4537.25,4155.43 ; J11.23@6007.91,4173.4 6056.48,4173.4 6066.87,4163.01 v1(6066.87,4138.99)
AR_DP3: J11.25 R133.1 U2.U5 | length 2407.4
  Top Layer w6.7: v1(4182.46,4393.1) U2.U5@4198.21,4377.35
  Sig1 w4.5: v1(4182.46,4393.1) 4198.21,4408.84 4198.21,4433.25 ; 4228.98,4361.6 4229.71,4360.88 4229.71,4292.08 4238.93,4282.86 4255.66,4282.86 4255.66,4282.75 4261.2,4277.2 4261.2,4259.06 4268.9,4251.36 4318.19,4251.36 ; 4228.98,4431.84 4228.98,4432.86 ; 4229.71,4411.06 4229.71,4433.15
  Sig1 w5.95: 4198.21,4433.25 4206.03,4441.06 4220.78,4441.06 4228.98,4432.86 ; 4228.98,4361.6 4228.98,4411.06 ; 4318.19,4251.36 4342.89,4226.67 4469.05,4226.67 4478.43,4217.29 4478.43,4206.63 4493.49,4191.56 4502.18,4191.56 v1(4519,4174.75) 4540.54,4174.75 4660.08,4055.2 4728.34,4055.2 4756.96,4026.58 4756.96,4018.07 4849.21,3925.82 4924.38,3925.82 4935.61,3937.06 5042.15,3937.06 5058.47,3920.74 5102.48,3920.74 5114.37,3932.63 5135.64,3932.63 5154.16,3951.16 5397.56,3951.16 5472.3,4025.89 5821.67,4025.89 5846.41,4050.63 5951.35,4050.63 5973.44,4072.73 5973.44,4130.25 v1(5949.98,4153.71)
  Bottom Layer w6.7: v1(4519,4174.75) R133.1@4537.25,4174.75 ; v1(5949.98,4153.71) J11.25@6007.91,4153.71
AR_DP4: J11.27 R135.1 U2.V3 | length 2293.3
  Top Layer w6.7: U2.V3@4261.2,4408.84 v1(4276.95,4424.59)
  Sig1 w5.95: v1(4494.9,4213.45) 4496.05,4213.45 4512.18,4229.58 4542.79,4229.58 4607.41,4164.95 4674.82,4164.95 4711.09,4128.67 4711.09,4110.12 4742.23,4078.99 4759.45,4078.99 4801.8,4036.65 4801.8,4006.88 4859.07,3949.61 4914.52,3949.61 4925.76,3960.85 5052,3960.85 5068.32,3944.53 5092.48,3944.53 5106.35,3958.4 5106.35,3967.82 5116,3977.47 5390.24,3977.47 5463.1,4050.33 5574.33,4050.33 5698,4174 5804,4174 5825.87,4152.13 5916.56,4152.13 v1(5933.38,4168.95)
  Bottom Layer w5: v1@4276.95,4419.75 4261.2,4404.01 4261.2,4355.5 4261.2,4355.08 4270.43,4345.85 4316.17,4345.85
  Bottom Layer w6.7: 4316.17,4345.85 4332.22,4345.85 4345.89,4332.18 4399.87,4332.18 4430.97,4301.09 4430.97,4240.33 4457.85,4213.45 v1(4494.9,4213.45) 4514.56,4193.79 R135.1@4537.25,4193.79 ; v1(5933.38,4168.95) 5933.38,4143.54 5942.89,4134.03 J11.27@6007.91,4134.03
AR_DP5: J11.29 R137.1 U2.M1 | length 2321.9
  Top Layer w6.7: U2.M1@4324.2,4219.87 4331.08,4212.98 4398.06,4212.98 4415.2,4230.12 4501.7,4230.12 4518.72,4213.1 v1(4519,4213.1)
  Sig1 w5.95: v1(4519,4213.1) 4665.01,4067.1 4735.13,4067.1 4768.85,4033.38 4768.85,4023 4854.14,3937.72 4919.45,3937.72 4930.69,3948.95 5047.08,3948.95 5063.39,3932.63 5097.55,3932.63 5109.44,3944.53 5130.71,3944.53 5151.36,3965.17 5394.76,3965.17 5467.37,4037.79 5790.28,4037.79 5815.02,4062.53 5918.43,4062.53 5924.37,4068.47 5924.37,4085.74 5917.05,4093.05 5752.9,4093.05 5748.41,4097.55 5748.41,4127.01 5756.06,4134.66 5926.35,4134.66 v1(5946.67,4114.34)
  Bottom Layer w6.7: v1(4519,4213.1) R137.1@4537.25,4213.11 ; v1(5946.67,4114.34) J11.29@6007.91,4114.34
AR_DP6: J11.31 R138.1 U2.L2 | length 2306.4
  Top Layer w5: U2.L2@4292.7,4188.37 4308.82,4204.49 4308.82,4226.24 4318.58,4235.99 4335.56,4235.99
  Top Layer w6.7: 4335.56,4235.99 4343.78,4227.77 4395.1,4227.77 4414.05,4246.72 v1(4493.52,4246.72)
  Sig2 w5.95: v1(4493.52,4246.72) 4493.52,4245.92 4509.2,4230.24 4532.49,4230.24 4547.64,4215.1 4804.22,4215.1 4873.11,4283.98 6066.82,4283.98 6110.96,4239.84 6110.96,4195.22 6072.48,4156.74 6053.82,4156.74 5972.05,4074.97 v1(5947.9,4074.97)
  Bottom Layer w6.7: v1(4493.52,4246.72) 4499.42,4240.82 4499.42,4239.84 4509.14,4230.12 4522.89,4230.12 4525.86,4233.08 R138.1@4537.25,4233.08 ; v1(5947.9,4074.97) 5947.9,4085.2 5957.35,4094.66 J11.31@6007.91,4094.66
AR_DP7: J11.33 R140.1 U2.L1 | length 2468.5
  Top Layer w6.7: U2.L1@4324.2,4188.37 4391.19,4188.37 4410.11,4207.29 4477.59,4207.29 4488.37,4196.51 4525.88,4196.51 4526.22,4196.85 4527.5,4196.85 4535.6,4204.95 4535.6,4227.14 v1(4516.02,4246.72)
  Sig2 w5.95: v1(4516.02,4246.72) 4560.49,4246.72 4567.71,4239.49 4811.79,4239.49 4868.42,4296.12 4900.64,4296.12 4903.83,4296.12 4908.62,4300.9 4908.62,4320.84 4913.4,4325.63 4919.78,4325.63 4924.56,4320.84 4924.56,4300.9 4929.35,4296.12 4935.73,4296.12 4940.51,4300.9 4940.51,4320.84 4945.3,4325.63 4951.67,4325.63 4956.46,4320.84 4956.46,4300.9 4961.24,4296.12 4967.62,4296.12 4972.41,4300.9 4972.41,4320.84 4977.19,4325.63 4983.57,4325.63 4988.35,4320.84 4988.35,4300.9 4993.14,4296.12 4999.52,4296.12 5004.3,4300.9 5004.3,4320.84 5009.08,4325.63 5015.46,4325.63 5020.25,4320.84 5020.25,4300.9 5025.03,4296.12 5031.41,4296.12 5036.19,4300.9 5036.19,4320.84 5040.98,4325.63 5047.36,4325.63 5052.14,4320.84 5052.14,4300.9 5056.92,4296.12 5063.88,4296.12 5831.7,4296.12 5852.35,4316.78 6051.34,4316.78 6122.86,4245.26 6122.86,4171.34 6067.59,4116.07 v1(6067.59,4071.83)
  Bottom Layer w5.95: J11.33@6007.91,4074.97 6064.44,4074.97 v1(6067.59,4071.83)
  Bottom Layer w6.7: v1(4516.02,4246.72) 4521.7,4252.4 R140.1@4537.25,4252.4
AR_GPIO_0: R66.1 RA5.8 U2.M2 | length 845.3
  Top Layer w6.7: v1(4276.95,4204.12) U2.M2@4292.7,4219.87
  Sig2 w5.95: v1(4276.95,4204.12) 4289.65,4191.42 4382.46,4191.42 4404.38,4213.33 4420.02,4213.33 4481.77,4275.08 4813.25,4275.08 4890.17,4352 4935.38,4352 4960.02,4376.64 v1(4960.02,4379.79)
  Bottom Layer w6.7: RA5.8@4952.34,4409.09 4952.34,4387.48 v1(4960.02,4379.79) 4962.26,4377.56 R66.1@4981.41,4377.56
AR_GPIO_1: R129.2 RA5.7 U2.L3 | length 1403.2
  Top Layer w6.7: v1(4245.46,4172.62) U2.L3@4261.2,4188.37 ; R129.2@5139.25,4519.45 5139.25,4410.27 v1(5160.84,4388.68)
  Sig2 w5.95: v1(4245.46,4172.62) 4380.49,4172.62 4409.3,4201.44 4424.95,4201.44 4486.7,4263.19 4818.67,4263.19 4893,4337.52 5109.69,4337.52 v1(5160.84,4388.68)
  Bottom Layer w6.7: RA5.7@4952.34,4424.84 4981.57,4424.84 5038,4368.41 5140.57,4368.41 v1@5158.08,4385.91
AR_GPIO_2: LD3.1 R115.1 RA5.6 U2.K3 | length 3948.2
  Top Layer w5.95: v1(6824.78,3961) R115.1@6844.78,3961
  Top Layer w6.7: v1(4245.46,4141.13) U2.K3@4261.2,4156.88 ; v1(4973.31,4455.06) 4979.31,4461.06 LD3.1@4979.31,4522.72
  Sig1 w5.95: v1(6226.68,4448.37) 6226.68,4360.49 6248.96,4338.21 6248.96,4253.51 6282.15,4220.31 6405.72,4220.31 6415.7,4210.33 6557.1,4210.33 6583.65,4236.89 6583.65,4276.96 6592.99,4286.29 6592.99,4369.07 6610.19,4386.28 6731.49,4386.28 6804.35,4313.42 6804.35,4076.19 6752.78,4024.62 6752.78,3956.54 6772.44,3936.88 6800.66,3936.88 v1(6824.78,3961)
  Sig2 w5.95: v1(4245.46,4141.13) 4243.4,4143.19 4227.54,4143.19 4212.53,4158.19 4212.53,4209.79 4223.33,4220.59 4394.81,4220.59 4406.98,4232.76 4422.62,4232.76 4476.84,4286.98 4808.33,4286.98 v1@4973.31,4451.96 ; v1(4973.31,4455.06) v1@4973.31,4451.96 ; v1(6226.68,4448.37) 6210.25,4431.94 6142.57,4431.94 6095.77,4478.74 5969.43,4478.74 5941.06,4450.38 5688.19,4450.38 5580.17,4342.36 5231.36,4342.36 5168.57,4405.15 5154.02,4405.15 5108.26,4359.39 5042.72,4359.39 4973.31,4428.79 v1@4973.31,4451.96
  Bottom Layer w6.7: RA5.6@4952.34,4440.59 4956.6,4440.59 v1@4972.18,4456.16
AR_HOSTINTR1: R3.1 R152.1 RA9.6 U2.B2 | length 2217.7
  Top Layer w6.7: U2.B2@4292.7,3904.91 v1(4308.45,3889.16)
  Sig1 w5.95: v1(4979.69,3994.63) 4979.69,3995.65 5022.55,4038.5 5078.71,4038.5 5118.81,4078.61 5228.77,4078.61 5315.76,4165.59 5315.76,4208.37 5189.21,4334.92 5189.21,4422.01 5289.86,4522.66 5497.63,4522.66 5667.88,4352.4 v1(5675.9,4352.4)
  Sig2 w5.95: v1(4308.45,3889.16) 4349.35,3889.16 4361.01,3877.5 4361.01,3850.85 4399.45,3812.41 4514.33,3812.41 4608.5,3906.58 4731.17,3906.58 4841.6,4017 4957.32,4017 v1(4979.69,3994.63)
  Bottom Layer w6.7: R3.1@4284.8,3889.16 v1(4308.45,3889.16) ; RA9.6@4960.68,3987.64 4969.78,3987.64 v1@4976.78,3994.63 ; v1(5675.9,4352.4) 5678.13,4350.18 R152.1@5678.13,4328.4
AR_LVDS_0_N: R149.1 RA6.7 U2.N1 | length 1347.9
  Top Layer w5.1: v1(4308.45,4267.11) U2.N1@4324.2,4251.36 ; v1@4955.46,4257.89 4951.31,4262.04 4951.31,4278.22 R149.1@4956.17,4283.07
  Sig1 w4.8: v1@4303.79,4271.41 4308.48,4266.72 4432.79,4266.72 4436.88,4262.64 4532.51,4262.64 4544.03,4251.11 4559.6,4251.11 4623.96,4186.74 4740.39,4186.74 4757.03,4170.1 4757.03,4122.55 4776.08,4103.49 4802.02,4103.49 4815.37,4116.84 4815.37,4160 4825.18,4169.81 4836.75,4169.81 4850.89,4155.66 4850.89,3980.23 4868.9,3962.22 4898.8,3962.22 4915.42,3978.85 4915.42,4207.44 4922.38,4214.4 4934.84,4214.4 4952.31,4231.87 4952.31,4254.74 v1@4955.46,4257.89
  Bottom Layer w5.1: RA6.7@4952.34,4292.08 4951.31,4291.06 4951.31,4262.04 v1@4955.46,4257.89
  other v1: 4954.45,4257.89
AR_LVDS_0_P: R148.1 RA6.8 U2.N2 | length 1378.2
  Top Layer w5.1: v1(4276.95,4267.11) U2.N2@4292.7,4251.36 ; R148.1@4932.76,4283.82 4937.61,4278.97 4937.61,4262.04 v1@4933.46,4257.89
  Sig1 w4.5: v1(4276.95,4267.11) 4276.95,4268.49 4291.33,4282.86 4314.97,4282.86 4315.02,4282.81 4329.69,4282.81 ; 4928.28,4230.4 4936.46,4238.59 4936.46,4254.89 v1@4933.46,4257.89
  Sig1 w4.8: 4315.11,4282.72 4443.56,4282.72 4447.64,4278.64 4539.13,4278.64 4550.66,4267.11 4566.22,4267.11 4630.59,4202.74 4747.02,4202.74 4773.03,4176.73 4773.03,4129.17 4782.71,4119.49 4795.39,4119.49 4799.37,4123.47 4799.37,4166.62 4813.87,4181.12 4818.56,4185.81 4843.37,4185.81 4866.89,4162.29 4866.89,3986.86 4875.53,3978.22 4892.17,3978.22 4899.42,3985.47 4899.42,4214.07 4915.75,4230.4 4928.28,4230.4
  Bottom Layer w5.1: v1@4933.46,4257.89 4924.29,4267.07 4924.29,4276.21 4929.55,4281.47 4933.77,4281.47 4936.59,4284.29 RA6.8@4936.59,4292.08
  other v1: 4932.45,4257.89
AR_LVDS_1_N: R147.1 RA7.5 U2.P1 | length 1514.7
  Top Layer w5.1: v1(4308.45,4298.61) U2.P1@4324.2,4282.86 ; v1@4996.38,4240.79 R147.1@5020,4240.79
  Sig1 w4.5: v1@4314.97,4298.61 4349.94,4298.61 ; v1@4315,4298.63 4461.96,4298.63
  Sig1 w4.8: 4349.94,4298.61 4462.36,4298.61 4474.02,4310.27 4585.93,4310.27 4594.45,4318.79 4713.9,4318.79 4723.1,4309.59 4723.1,4299.06 4718.12,4294.08 4625.17,4294.08 4609.92,4278.83 4609.92,4253.99 4639.23,4224.67 4762.1,4224.67 4775.28,4237.85 4775.28,4251.38 4783.96,4260.05 4801.76,4260.05 4810.09,4251.73 4810.09,4225.13 4825.25,4209.97 4864.39,4209.97 4883.45,4229.03 4883.45,4276.27 4904.75,4297.57 4989.83,4297.57 5016.62,4270.79 5016.62,4250.37 5014.7,4248.45 5008.13,4248.45 5005.1,4251.48 5005.1,4269.16 5002.59,4271.67 4996.91,4271.67 4994.13,4268.9 4994.13,4258.43 4980.76,4245.35 4980.76,4237.78 4985.99,4232.54 4992.41,4232.54 4995.28,4235.41 v1(4995.28,4239.89)
  Bottom Layer w5.1: RA7.5@4952.83,4236.76 4972.37,4236.76 4988.26,4252.65 4998.09,4252.65 5000.59,4250.16 5000.59,4245.19 v1(4995.28,4239.89)
AR_LVDS_1_P: R146.1 RA7.6 U2.P2 | length 1377.6
  Top Layer w5.1: v1(4276.95,4298.61) U2.P2@4292.7,4282.86 ; v1(4995.28,4215.89) 5001.84,4222.44 5015.35,4222.44 R146.1@5020,4217.79
  Sig1 w4.5: v1(4276.95,4298.61) 4292.7,4314.36 4314.97,4314.36 ; 4315,4314.33 4455.46,4314.33
  Sig1 w4.8: 4455.46,4314.33 4467.4,4326.27 4579.3,4326.27 4587.82,4334.79 4596.74,4334.79 4720.53,4334.79 4739.1,4316.22 4739.1,4292.43 4724.75,4278.08 4631.8,4278.08 4625.92,4272.2 4625.92,4260.61 4645.86,4240.67 4755.47,4240.67 4759.28,4244.48 4759.28,4258 4777.33,4276.05 4808.39,4276.05 4826.09,4258.35 4826.09,4231.76 4831.88,4225.97 4857.76,4225.97 4867.45,4235.66 4867.45,4282.9 4898.12,4313.57 4996.46,4313.57 5032.62,4277.41 5032.62,4236.67 5016.84,4220.89 5000.28,4220.89 v1(4995.28,4215.89)
  Bottom Layer w5.1: RA7.6@4953.34,4221.53 4953.86,4222.04 4984.13,4222.04 4990.28,4215.89 v1(4995.28,4215.89)
AR_LVDS_CLK_N: R145.1 RA7.7 U2.R2 | length 1444.6
  Top Layer w5.1: v1(4276.95,4330.1) U2.R2@4292.7,4314.36 ; v1(4988.85,4165.65) 4984.7,4169.8 4984.7,4177.53 4989.02,4181.85 5007.99,4181.85 5014.75,4175.09 5043.82,4175.09 R145.1@5047.69,4171.22
  Sig1 w4.5: v1(4276.95,4330.1) 4292.7,4345.85 4346.47,4345.85 4346.57,4345.95 4431.27,4345.95 4431.74,4346.42
  Sig1 w4.8: 4431.74,4346.42 4443.39,4358.07 4566.13,4358.07 4568.59,4360.53 4568.59,4394.28 4589.88,4415.56 4614.56,4415.56 4628.27,4401.85 4628.27,4379.9 4632.61,4375.56 4644.03,4375.56 4648.37,4379.9 4648.37,4401.85 4662.08,4415.56 4686.76,4415.56 4700.47,4401.85 4700.47,4379.9 4704.81,4375.56 4733.99,4375.56 4784.96,4324.59 4801.1,4324.59 4806.33,4329.83 4806.33,4382.57 4820.04,4396.28 4844.72,4396.28 4858.43,4382.57 4858.43,4360.8 4862.77,4356.46 5007.03,4356.46 5070.47,4293.03 5070.47,4195.36 5053.39,4178.29 4989.05,4178.29 4985.85,4175.09 4985.85,4168.65 v1(4988.85,4165.65)
  Bottom Layer w5.1: RA7.7@4953.34,4205.78 4954.37,4204.75 4970.09,4204.75 4984.7,4190.14 4984.7,4169.8 v1(4988.85,4165.65)
AR_LVDS_CLK_P: R144.1 RA7.8 U2.R1 | length 1469.1
  Top Layer w5.1: v1(4308.45,4330.1) U2.R1@4324.2,4314.36 ; v1(4966.85,4165.65) 4966.85,4179.06 4983.34,4195.55 5013.67,4195.55 5020.43,4188.79 5044.92,4188.79 R144.1@5048.79,4192.66
  Sig1 w4.8: v1(4308.45,4330.1) 4438.05,4330.1 4450.02,4342.07 4572.76,4342.07 4584.59,4353.9 4584.59,4387.65 4596.51,4399.56 4607.93,4399.56 4612.27,4395.23 4612.27,4373.28 4625.98,4359.56 4650.66,4359.56 4664.37,4373.28 4664.37,4395.23 4668.71,4399.56 4680.13,4399.56 4684.47,4395.23 4684.47,4373.28 4698.18,4359.56 4727.36,4359.56 4778.34,4308.59 4807.72,4308.59 4822.33,4323.2 4822.33,4343.44 4822.33,4354.17 4822.33,4375.94 4826.67,4380.28 4838.09,4380.28 4842.43,4375.94 4842.43,4354.17 4856.14,4340.46 5000.41,4340.46 5054.47,4286.4 5054.47,4201.99 5046.76,4194.29 4950.32,4194.29 4942.74,4186.71 4942.74,4170.03 4947.13,4165.65 v1(4966.85,4165.65)
  Bottom Layer w5.1: RA7.8@4954.37,4191.05 RA7.8@4953.34,4190.03 4961.5,4190.03 4964.41,4187.12 4964.41,4180.64 4961.93,4178.16 4945.93,4178.16 4940.41,4172.64 4940.41,4168.9 4943.66,4165.65 v1(4966.85,4165.65)
AR_LVDS_FRCLK_N: R143.1 RA8.5 U2.T2 | length 1399.8
  Top Layer w5.1: U2.T2@4292.7,4345.85 v1(4308.45,4361.6) ; v1(4966.85,4136.73) 4973.39,4130.19 4973.39,4117.17 R143.1@4967.77,4111.55
  Sig1 w4.5: 4324.2,4377.35 4351.72,4377.35
  Sig1 w4.8: v1(4308.45,4361.6) 4324.2,4377.35 ; 4351.72,4377.35 4369.12,4394.74 4369.12,4443.73 4409.95,4484.56 4491.96,4484.56 4518.26,4458.25 4824.18,4458.25 4848.55,4433.88 4983.07,4433.88 5109.57,4307.38 5109.57,4159.2 5038.01,4087.64 4991.11,4087.64 4971.7,4107.05 4971.7,4131.88 v1(4966.85,4136.73)
  Bottom Layer w5.1: RA8.5@4952.69,4119.49 4953.71,4118.47 4966.52,4118.47 4973,4124.95 4973,4130.58 v1(4966.85,4136.73)
AR_LVDS_FRCLK_P: R142.1 RA8.6 U2.T1 | length 1400.6
  Top Layer w5.1: U2.T1@4324.2,4345.85 v1(4339.94,4361.6) ; R142.1@4992.71,4111.55 4987.09,4117.17 4987.09,4130.97 v1(4992.85,4136.73)
  Sig1 w4.5: 4990.31,4111.06 4990.31,4118.68 4992.11,4120.47 5012.98,4120.47 5017.87,4125.35 5017.87,4133.27 5014.4,4136.73 v1(4992.85,4136.73)
  Sig1 w4.8: v1(4339.94,4361.6) 4358.6,4361.6 4385.12,4388.12 4385.12,4437.1 4416.57,4468.56 4485.33,4468.56 4511.64,4442.25 4817.55,4442.25 4841.92,4417.88 4976.45,4417.88 5038.46,4355.86 5093.66,4300.66 5093.66,4165.91 5031.38,4103.64 4997.74,4103.64 4990.31,4111.06
  Bottom Layer w5.1: RA8.6@4952.69,4103.74 4953.71,4104.77 4972.19,4104.77 4986.07,4118.64 5014.98,4118.64 5019.81,4123.47 5019.81,4132.27 5015.35,4136.73 v1(4992.85,4136.73)
AR_MCUCLKOUT: RA1.2 U2.V13 | length 912.6
  Top Layer w6.7: v1(3930.5,4424.59) U2.V13@3946.24,4408.84
  Sig2 w5.95: v1(3930.5,4424.59) 3928.19,4426.9 3928.19,4480.17 3985.52,4537.5 4468.02,4537.5 4518.57,4588.05 4655.12,4588.05 v1(4685.21,4618.14)
  Bottom Layer w6.7: RA1.2@4680.21,4600.58 4680.21,4613.14 v1(4685.21,4618.14)
AR_MISO1: R121.2 U2.D1 | length 3284.5
  Top Layer w6.7: v1(4308.45,3952.15) U2.D1@4324.2,3967.9 ; v1@6621.04,4333.23 R121.2@6639.03,4333.23
  Sig2 w4.5: v1(4308.45,3952.15) 4324.2,3936.4 4354.1,3936.4 4354.83,3937.13
  Sig2 w5.95: 4354.83,3937.13 4361.44,3937.13 4372.91,3925.66 4372.91,3855.77 4404.38,3824.3 4509.4,3824.3 4603.57,3918.47 4726.25,3918.47 4836.67,4028.89 4979.54,4028.89 4996.01,4012.42 4996.01,3972.76 5043.76,3925.01 5156.99,3925.01 5200.46,3881.53 5200.46,3729.32 5213.74,3716.04 5717.64,3716.04 5766.81,3765.21 5867.81,3765.21 5925.35,3707.67 6230.52,3707.67 6249.35,3726.5 6249.35,3783.85 6353.24,3887.74 6389.62,3887.74 6411.96,3910.08 6475.27,3910.08 6515.07,3949.88 6515.07,4102.64 6544.36,4131.93 6564.41,4131.93 6595.55,4163.07 6595.55,4311.03 6617.52,4333 v1(6618.45,4333)
AR_MOSI1: R128.2 U2.F2 | length 3442.7
  Top Layer w6.7: v1(4276.95,4015.14) U2.F2@4292.7,4030.89 ; v1(6617.81,4271) 6619.56,4269.25 6670.56,4269.25 6685.71,4254.1 R128.2@6685.71,4240.71 6685.71,4167.71 6674.74,4156.74 v1(6671.76,4156.74)
  Sig1 w4.5: 4298.2,4030.13 4298.96,4030.89 4315.78,4030.89
  Sig1 w5.5: v1(4276.95,4015.14) 4281.75,4019.94 4288.01,4019.94 4298.2,4030.13
  Sig1 w5.95: 4315.78,4030.89 4316.36,4030.32 4316.57,4030.32 ; 4316,4030.89 4316.57,4030.32 ; v1(6671.76,4156.74) 6707.37,4156.74 6713.44,4150.66 6713.44,4056.18 6695.34,4038.07 6650.14,4038.07 6645.51,4033.44 6645.51,4022.15 6658.05,4009.61 6658.05,4000.78 6645.8,3988.53 6265.17,3988.53 6230.16,3953.52 6230.16,3834.57 6224.41,3828.82 6224.41,3801.5 6161.2,3738.29 5837.07,3738.29 5802.08,3773.28 5802.08,3848.99 5726.34,3924.73 5706.97,3924.73 5659.85,3877.61 5564.53,3877.61 5407.56,3720.64 5169.06,3720.64 5140.34,3749.37 5140.34,3803.39 5082.45,3861.27 5033.83,3861.27 5017.76,3877.34 4960,3877.34 4945.78,3863.12 4647.49,3863.12 4616.86,3832.48 4590.58,3832.48 4482.26,3940.8 4447.59,3940.8 4447.59,3941.6 4366.75,4022.44 4324.45,4022.44 4316.57,4030.32